# Altium PCB PCB.PcbDoc
Units mil, origin at the board's own origin, x right, y up, seen from the top; angles counter-clockwise.
Board outline 1418.05 x 1418.05 mil, 2 copper layers (Top Layer, Bottom Layer); 70 components, 53 nets, 247 pads, 87 vias.
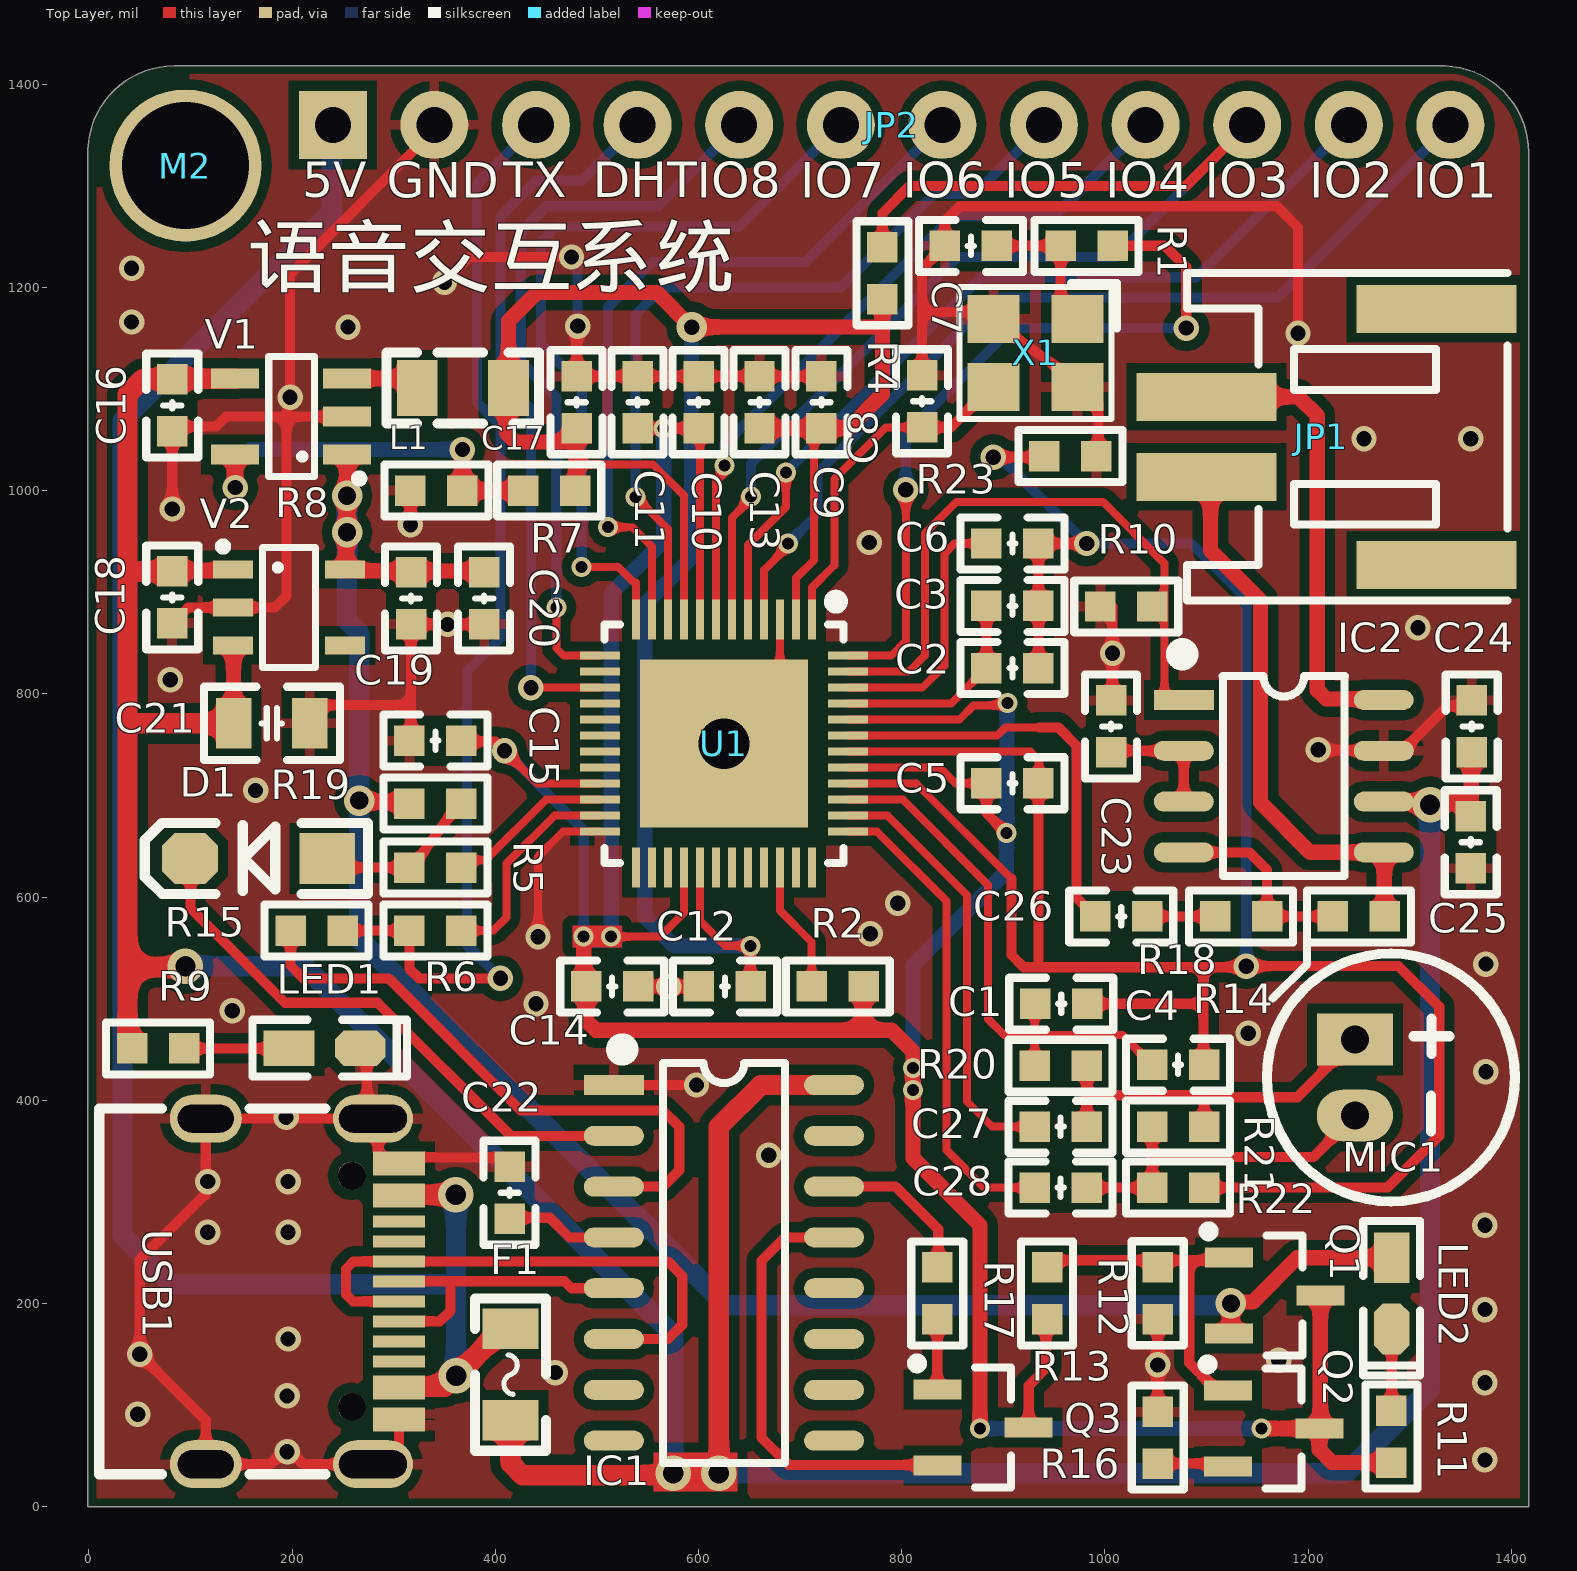
[diagram p0: Top Layer view]
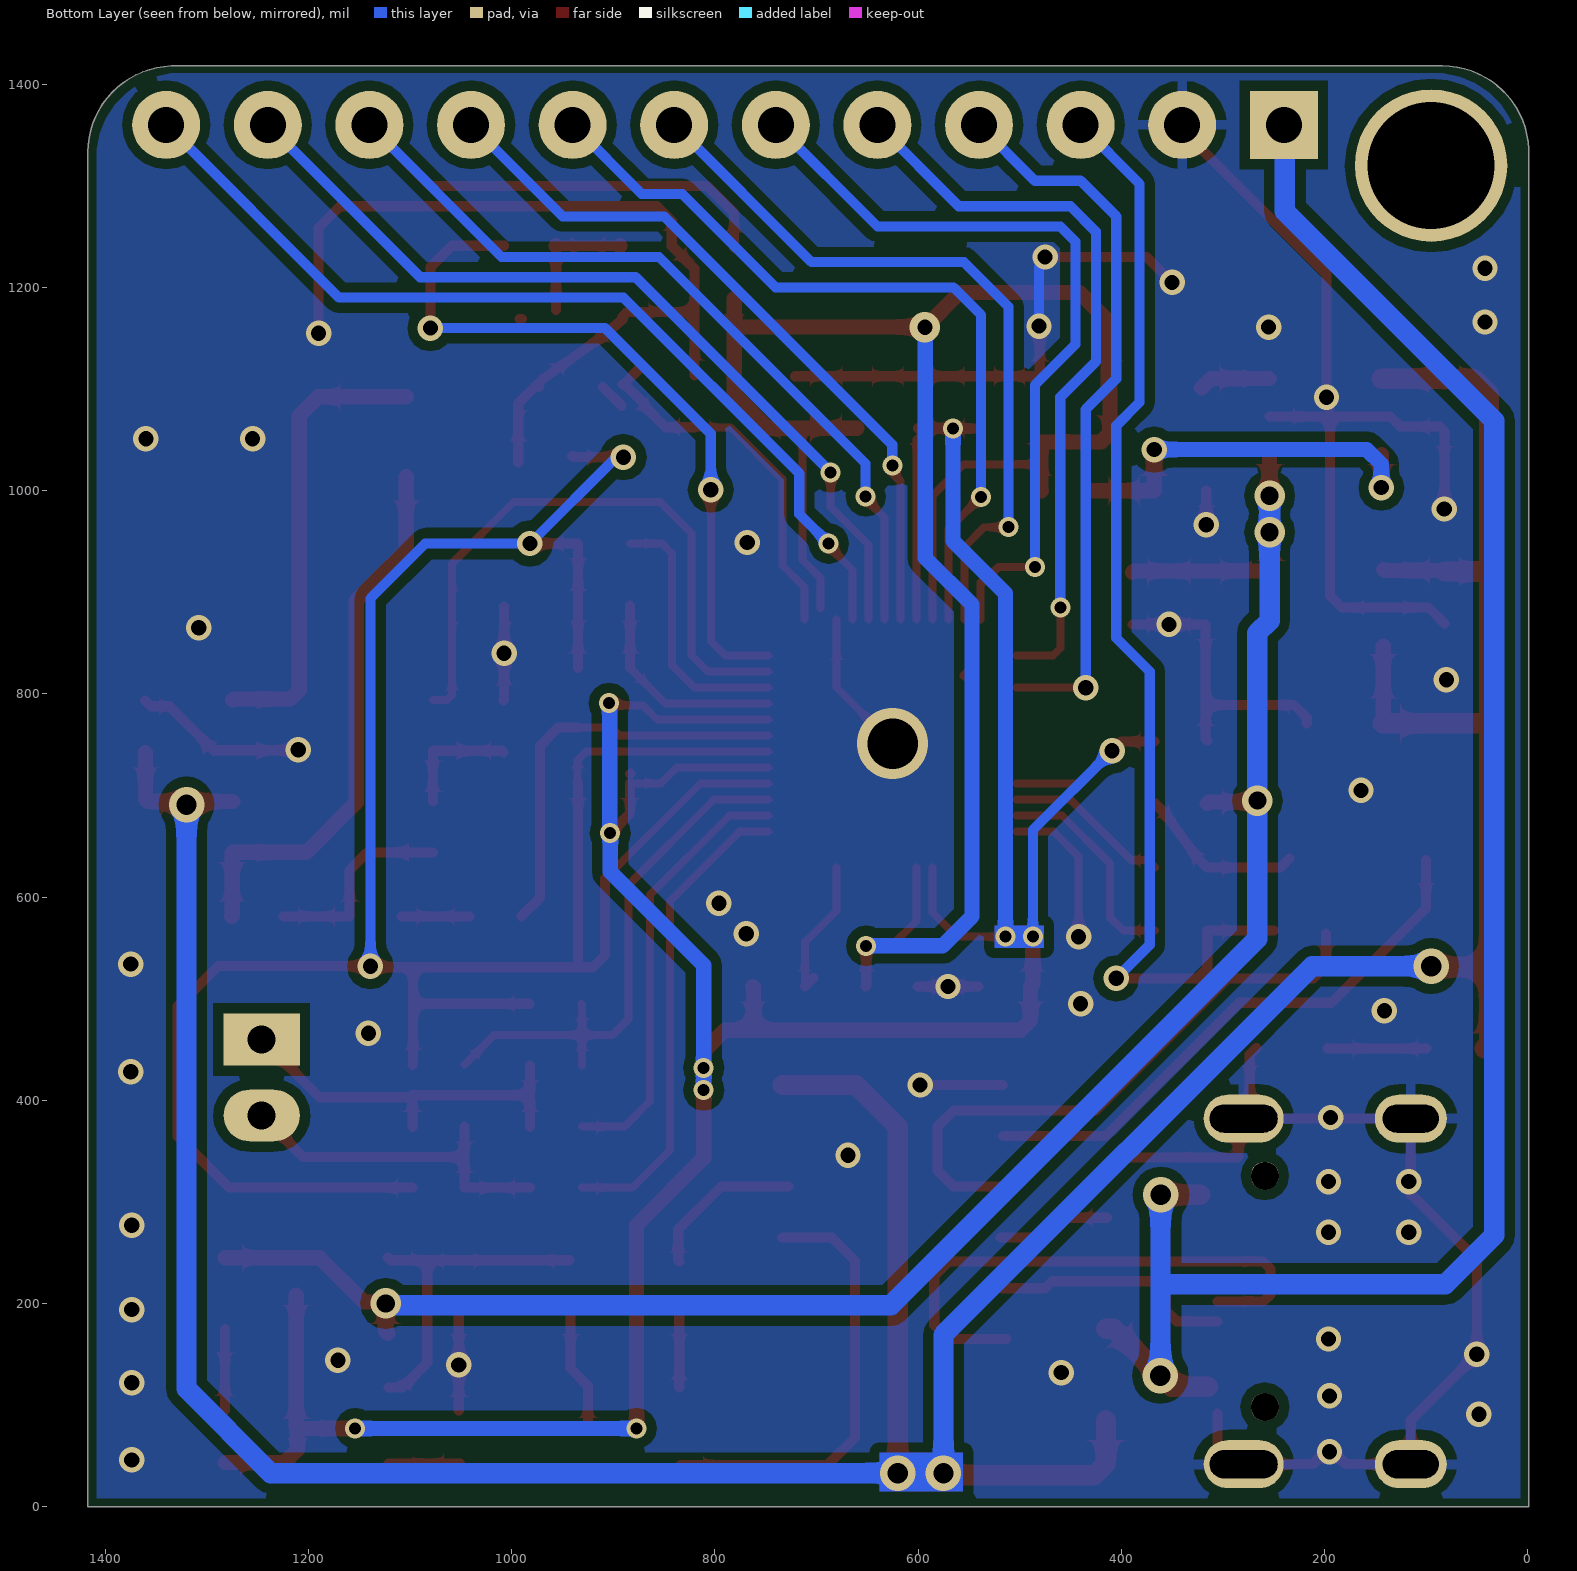
[diagram p1: Bottom Layer view, seen from below]
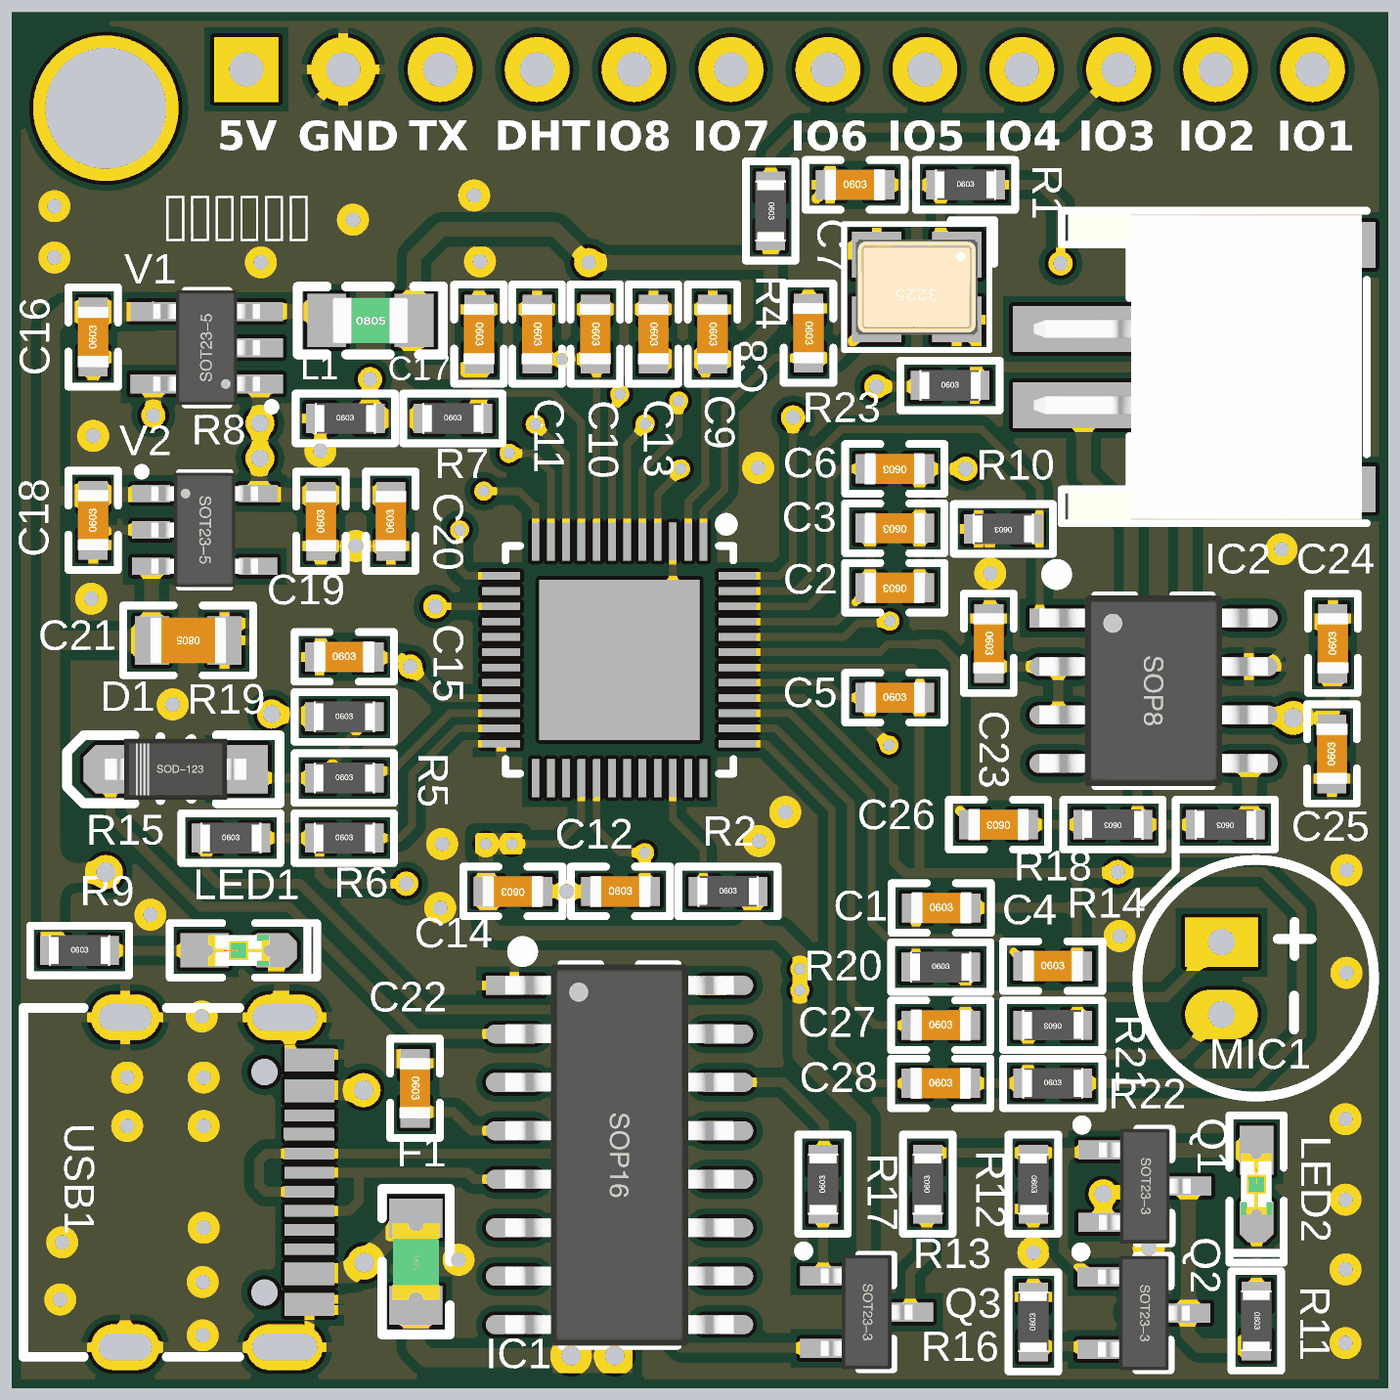
[diagram p2: 3D render of the assembled board from above, using the file's embedded part models]

## Layer stack, top to bottom
Top Solder: solder mask 0.4, Solder Resist, Dk 3.5
Top Layer: signal copper 1.4
Dielectric 1: dielectric 12.6, FR-4, Dk 4.8
Bottom Layer: signal copper 1.4
Bottom Solder: solder mask 0.4, Solder Resist, Dk 3.5

## Board outline
-1,0 -1,1336 cw(c84,1333) 84,1418.05 1335,1418 cw(c1332,1333) 1417.05,1333 1417,0

## Design rules (kind name [scope] priority, off if disabled: settings)
Clearance [All] p1: gap=10 ignorepadtopadclearanceinfootprint=FALSE
PolygonConnect PolygonConnect_13 [IsVia] p1: thpad.connectstyle=Relief thpad.reliefconductorwidth=10 thpad.reliefentries=4 thpad.polygonreliefangle="90 Angle" thpad.airgapwidth=10 smdpad.connectstyle=Relief smdpad.reliefconductorwidth=10 smdpad.reliefentries=4 smdpad.polygonreliefangle="90 Angle" smdpad.airgapwidth=10 via.connectstyle=Direct via.reliefconductorwidth=10 via.reliefentries=4 via.polygonreliefangle="90 Angle" via.airgapwidth=10
PolygonConnect 154145 [All] p2: thpad.connectstyle=Relief thpad.reliefconductorwidth=10 thpad.reliefentries=4 thpad.polygonreliefangle="90 Angle" thpad.airgapwidth=10 smdpad.connectstyle=Relief smdpad.reliefconductorwidth=10 smdpad.reliefentries=4 smdpad.polygonreliefangle="90 Angle" smdpad.airgapwidth=10 via.connectstyle=Direct via.reliefconductorwidth=10 via.reliefentries=4 via.polygonreliefangle="90 Angle" via.airgapwidth=10
PolygonConnect PolygonConnect_12 [IsVia] p3: thpad.connectstyle=Relief thpad.reliefconductorwidth=10 thpad.reliefentries=4 thpad.polygonreliefangle="90 Angle" thpad.airgapwidth=10 smdpad.connectstyle=Relief smdpad.reliefconductorwidth=10 smdpad.reliefentries=4 smdpad.polygonreliefangle="90 Angle" smdpad.airgapwidth=10 via.connectstyle=Direct via.reliefconductorwidth=10 via.reliefentries=4 via.polygonreliefangle="90 Angle" via.airgapwidth=10
PolygonConnect PolygonConnect_11 [IsVia] p4: thpad.connectstyle=Direct thpad.reliefconductorwidth=10 thpad.reliefentries=4 thpad.polygonreliefangle="90 Angle" thpad.airgapwidth=10 smdpad.connectstyle=Relief smdpad.reliefconductorwidth=10 smdpad.reliefentries=4 smdpad.polygonreliefangle="90 Angle" smdpad.airgapwidth=10 via.connectstyle=Relief via.reliefconductorwidth=10 via.reliefentries=4 via.polygonreliefangle="90 Angle" via.airgapwidth=10
PolygonConnect PolygonConnect_10 [IsVia] p5: thpad.connectstyle=Direct thpad.reliefconductorwidth=10 thpad.reliefentries=4 thpad.polygonreliefangle="90 Angle" thpad.airgapwidth=10 smdpad.connectstyle=Relief smdpad.reliefconductorwidth=10 smdpad.reliefentries=4 smdpad.polygonreliefangle="90 Angle" smdpad.airgapwidth=10 via.connectstyle=Relief via.reliefconductorwidth=10 via.reliefentries=4 via.polygonreliefangle="90 Angle" via.airgapwidth=10
PolygonConnect PolygonConnect_9 [IsVia] p6: thpad.connectstyle=Direct thpad.reliefconductorwidth=10 thpad.reliefentries=4 thpad.polygonreliefangle="90 Angle" thpad.airgapwidth=10 smdpad.connectstyle=Relief smdpad.reliefconductorwidth=10 smdpad.reliefentries=4 smdpad.polygonreliefangle="90 Angle" smdpad.airgapwidth=10 via.connectstyle=Relief via.reliefconductorwidth=10 via.reliefentries=4 via.polygonreliefangle="90 Angle" via.airgapwidth=10
PolygonConnect PolygonConnect_8 [IsVia] p7: thpad.connectstyle=Direct thpad.reliefconductorwidth=10 thpad.reliefentries=4 thpad.polygonreliefangle="90 Angle" thpad.airgapwidth=10 smdpad.connectstyle=Relief smdpad.reliefconductorwidth=10 smdpad.reliefentries=4 smdpad.polygonreliefangle="90 Angle" smdpad.airgapwidth=10 via.connectstyle=Relief via.reliefconductorwidth=10 via.reliefentries=4 via.polygonreliefangle="90 Angle" via.airgapwidth=10
PolygonConnect PolygonConnect_7 [IsVia] p8: thpad.connectstyle=Direct thpad.reliefconductorwidth=10 thpad.reliefentries=4 thpad.polygonreliefangle="90 Angle" thpad.airgapwidth=10 smdpad.connectstyle=Relief smdpad.reliefconductorwidth=10 smdpad.reliefentries=4 smdpad.polygonreliefangle="90 Angle" smdpad.airgapwidth=10 via.connectstyle=Relief via.reliefconductorwidth=10 via.reliefentries=4 via.polygonreliefangle="90 Angle" via.airgapwidth=10
PolygonConnect PolygonConnect_6 [IsVia] p9: thpad.connectstyle=Direct thpad.reliefconductorwidth=10 thpad.reliefentries=4 thpad.polygonreliefangle="90 Angle" thpad.airgapwidth=10 smdpad.connectstyle=Relief smdpad.reliefconductorwidth=10 smdpad.reliefentries=4 smdpad.polygonreliefangle="90 Angle" smdpad.airgapwidth=10 via.connectstyle=Relief via.reliefconductorwidth=10 via.reliefentries=4 via.polygonreliefangle="90 Angle" via.airgapwidth=10
PolygonConnect PolygonConnect_5 [IsVia] p10: thpad.connectstyle=Direct thpad.reliefconductorwidth=10 thpad.reliefentries=4 thpad.polygonreliefangle="90 Angle" thpad.airgapwidth=10 smdpad.connectstyle=Relief smdpad.reliefconductorwidth=10 smdpad.reliefentries=4 smdpad.polygonreliefangle="90 Angle" smdpad.airgapwidth=10 via.connectstyle=Relief via.reliefconductorwidth=10 via.reliefentries=4 via.polygonreliefangle="90 Angle" via.airgapwidth=10 // 1
PolygonConnect PolygonConnect_4 [All vs IsNamedPolygon('GND_L02_P005')] p11: connectstyle=Relief reliefconductorwidth=10 reliefentries=4 polygonreliefangle="90 Angle" airgapwidth=10
PolygonConnect N [IsVia] p12: thpad.connectstyle=Direct thpad.reliefconductorwidth=10 thpad.reliefentries=4 thpad.polygonreliefangle="90 Angle" thpad.airgapwidth=10 smdpad.connectstyle=Relief smdpad.reliefconductorwidth=10 smdpad.reliefentries=4 smdpad.polygonreliefangle="90 Angle" smdpad.airgapwidth=10 via.connectstyle=Relief via.reliefconductorwidth=10 via.reliefentries=4 via.polygonreliefangle="90 Angle" via.airgapwidth=10
PolygonConnect PolygonConnect_3 [All vs IsNamedPolygon('NONET_L02_P004')] p13: thpad.connectstyle=Direct thpad.reliefconductorwidth=10 thpad.reliefentries=4 thpad.polygonreliefangle="90 Angle" thpad.airgapwidth=10 smdpad.connectstyle=Relief smdpad.reliefconductorwidth=10 smdpad.reliefentries=4 smdpad.polygonreliefangle="90 Angle" smdpad.airgapwidth=10 via.connectstyle=Relief via.reliefconductorwidth=10 via.reliefentries=4 via.polygonreliefangle="90 Angle" via.airgapwidth=10
PolygonConnect PolygonConnect_2 [All vs IsNamedPolygon('NONET_L02_P003')] p14: thpad.connectstyle=Direct thpad.reliefconductorwidth=10 thpad.reliefentries=4 thpad.polygonreliefangle="90 Angle" thpad.airgapwidth=10 smdpad.connectstyle=Relief smdpad.reliefconductorwidth=10 smdpad.reliefentries=4 smdpad.polygonreliefangle="90 Angle" smdpad.airgapwidth=10 via.connectstyle=Relief via.reliefconductorwidth=10 via.reliefentries=4 via.polygonreliefangle="90 Angle" via.airgapwidth=10
PolygonConnect PolygonConnect_1 [IsVia] p15: thpad.connectstyle=Relief thpad.reliefconductorwidth=10 thpad.reliefentries=4 thpad.polygonreliefangle="90 Angle" thpad.airgapwidth=10 smdpad.connectstyle=Relief smdpad.reliefconductorwidth=10 smdpad.reliefentries=4 smdpad.polygonreliefangle="90 Angle" smdpad.airgapwidth=10 via.connectstyle=Direct via.reliefconductorwidth=10 via.reliefentries=4 via.polygonreliefangle="45 Angle" via.airgapwidth=10
PolygonConnect [All] p16: connectstyle=Relief reliefconductorwidth=10 reliefentries=4 polygonreliefangle="90 Angle" airgapwidth=10
RoutingVias [All] p1: holewidth=28 width=50 viastyle="Through Hole" minholewidth=28 minwidth=50 maxholewidth=28 maxwidth=50
SolderMaskExpansion [All] p1: expansion=4 istentingtop=FALSE
Width [All] p1: maxlimit=50 minlimit=5 preferedwidth=20
30 further rules are at their usual default settings.

## Classes and differential pairs
polygon class PolygonClass_1: NONET_L01_P000
component class OTHER: C16 C17 C18 C19 C20 C21 C22 C23 C24 C25 C26 C27 C28 D1 F1 IC1 IC2 JP2 L1 LED1 LED2 M1 M2 MIC1 Q1 Q2 Q3 R3 R7 R8 R9 R10 R11 R12 R13 R14 R15 R16 R17 R18 R19 R20 R21 R22 R23 USB1 V1 V2
component class MCU: C1 C2 C3 C4 C5 C6 C7 C8 C9 C10 C11 C12 C13 C14 C15 R1 R2 R3 R4 R5 R6 U1 X1

## Components (designator, comment, footprint, x,y, rotation, side; value= is the part's Value field where it differs from the comment)
C1 "104" "C 0603_L" 957,495 r0 top
C2 "104" "C 0603_L" 908.99,825.33 r180 top
C3 "4.7uF" "C 0603_L" 908.99,886.66 r180 top
C4 "4.7uF" "C 0603_L" 1072,435 r0 top
C5 "4.7uF" "C 0603_L" 909,712 r0 top
C6 "4.7uF" "C 0603_L" 908.99,948 r180 top
C7 "22pF" "C 0603_L" 868,1241 r0 top
C8 "22pF" "C 0603_L" 820,1088 r270 top
C9 "104" "C 0603_L" 721,1087 r270 top
C10 "104" "C 0603_L" 600,1087 r270 top
C11 "104" "C 0603_L" 540,1087 r270 top
C12 "104" "C 0603_L" 626,512.01 r0 top
C13 "104" "C 0603_L" 660,1087 r270 top
C14 "104" "C 0603_L" 515,512 r180 top
C15 "104" "C 0603_L" 341,754 r0 top
C16 "4.7uF" "C 0603_L" 82,1084 r90 top
C17 "4.7uF" "C 0603_L" 480,1087 r270 top
C18 "4.7uF" "C 0603_L" 82,895 r90 top
C19 "4.7uF" "C 0603_L" 317,894 r90 top
C20 "104" "C 0603_L" 389,894 r90 top
C21 "10uF" "C 0805_L" 180,771 r180 top
C22 "104" "C 0603_L" 414,309 r270 top
C23 "1uF" "C 0603_L" 1006,768 r270 top
C24 "104" "C 0603_L" 1361,768 r90 top
C25 "10uF" "C 0603_L" 1360,654 r90 top
C26 "104" "C 0603_L" 1016,581 r180 top
C27 "104" "C 0603_L" 956.41,374 r0 top
C28 "104" "C 0603_L" 956.41,314 r0 top
D1 "1N4007" SOD-123 167,638 r180 top
F1 "MSMD200" "FU 0805" 415,130 r270 top
IC1 "CH340C" SOP16_L 625,240 r0 top
IC2 "BL6281" SOP8_L 1176,719 r0 top
JP1 "HDR-1X2" PH2.0-WS-2P 1326,1053 r90 top
JP2 "HDR-1X12" HDR2.54-LI-12P 790,1360 r0 top
L1 "2.2uH" "L 0805" 368,1101 r0 top
LED1 "红色" "LED 0603R" 232,451 r0 top
LED2 "红色" "LED 0603R" 1282,210 r270 top
M1 "" "M3 125X200"#1 1629,1008 r0 top
M2 "" "M3 125X200"#2 95,1320 r0 top
MIC1 "MIC" MIC-6*2.7 1246,459.8 r270 top
Q1 "SI2301" SOT23-3N 1167,208 r270 top
Q2 "SI2302" SOT23-3N 1166,77 r270 top
Q3 "SS8550" SOT23-3N 880,78 r270 top
R1 "470R" "R 0603_L" 982,1241 r0 top
R2 "4K7" "R 0603_L" 737,512 r0 top
R4 "2.2K" "R 0603_L" 781,1214 r270 top
R5 "330R" "R 0603_L" 341,629 r0 top
R6 "330R" "R 0603_L" 341,567 r0 top
R7 "22K" "R 0603_L" 453,1000 r0 top
R8 "22K" "R 0603_L" 342,1000 r0 top
R9 "3K3" "R 0603_L" 68,451 r0 top
R10 "10K" "R 0603_L" 1021,886 r180 top
R11 "4K7" "R 0603_L" 1282,69 r270 top
R12 "47K" "R 0603_L" 1052,210 r270 top
R13 "330R" "R 0603_L" 943,210 r90 top
R14 "22K" "R 0603_L" 1250,581 r180 top
R15 "330R" "R 0603_L" 224,567 r0 top
R16 "100R" "R 0603_L" 1052,68 r90 top
R17 "470R" "R 0603_L" 835,210 r90 top
R18 "4K7" "R 0603_L" 1134,581 r180 top
R19 "4K7" "R 0603_L" 340.99,692 r0 top
R20 "2.2K" "R 0603_L" 956.41,434 r0 top
R21 "10K" "R 0603_L" 1072,374 r180 top
R22 "2.2K" "R 0603_L" 1072,314 r0 top
R23 "0R" "R 0603_L" 966,1034 r0 top
U1 "TW-ASR-ONE" "QFN48 6X6" 625,751 r270 top
USB1 "TYPE-C" TYPE-C_16P 279.57,382 r270 top
V1 "RY3408" SOT23-5N 199,1073 r90 top
V2 "LIN1134A332MR" SOT23-5L 197,885 r270 top
X1 "12.288MHz" "OSC 3225-4P" 931.66,1135.54 r180 top

## Footprints (in the part's own frame and the unit in brackets; to place one, negate y for a bottom-side part, rotate by r counter-clockwise, add the part's x,y. Pads: shape width x height; smd on the part's side, far side on the other; paste and mask are expansions set on the pad)
"C 0603_L" [mil] "无极性贴片电容"
  rect 30x30 smd: 1(-25.59,0) 2(25.59,0)
  silkscreen extent -51,-26 51,26, body extent -31,-16 31,16, height 32
"C 0805_L" [mil] "无极性贴片电容"
  rect 35x50 smd: 1(-37.4,0) 2(37.4,0)
  silkscreen extent -67,-36 67,36, body extent -39,-24 39,24, height 20
"FU 0805" [mil] "贴片保险丝"
  rect 40x55 smd: 1(-45,0) 2(45,0)
  silkscreen extent -75,-35 75,35, body extent -39,-24 39,24, height 20
HDR2.54-LI-12P [mm] "排针，13脚"
  rect 1.7x1.7 hole 0.9: 1(-13.97,0)
  round 1.7 hole 0.9: 2(-11.43,0) 3(-8.89,0) 4(-6.35,0) 5(-3.81,0) 6(-1.27,0) 7(1.27,0) 8(3.81,0) 9(6.35,0) 10(8.89,0) 11(11.43,0) 12(13.97,0)
"L 0805" [mil] "小功率贴片电感"
  rect 40x55 smd: 1(-45,0) 2(45,0)
  silkscreen extent -75,-35 75,35, body extent -39,-24 39,24, height 35
"LED 0603R" [mil] "红色0603LED"
  rect 50x35 smd: 1(-35,0.26)
  oct 50x35 smd: 2(35,0.26)
  silkscreen extent -71,-28 81,28, body extent -31,-16 32,16, height 24
"M3 125X200"#1 [mil] "M3螺丝孔，孔125Mil，焊盘200Mil"
"M3 125X200"#2 [mil] "M3螺丝孔，孔125Mil，焊盘200Mil"
  round 150 hole 125: 1(0,0)
MIC-6*2.7 [mil]
  rect 51x75 hole 27.56: 1(0,0)
  oval 51x75 hole 27.56: 2(74.8,0)
  silkscreen extent -85,-87 159,157
"OSC 3225-4P" [mm] "3.2*2.5*0.7mm(长宽高)"
  rect 1.3x1.2 smd: 1(-1.05,-0.85) 2(1.05,-0.85) 3(1.05,0.85) 4(-1.05,0.85)
  silkscreen extent -2.03,-1.75 1.91,1.65, body extent -1.6,-1.25 1.6,1.25, height 0.7
PH2.0-WS-2P [mm] "长：8mm，宽：7.6mm，高：5.5mm"
  rect 1.2x4 smd: 0(-3.2,-0.006) 0(3.2,-0.006)
  rect 1.2x3.5 smd: 1(-1,5.744) 2(1,5.744)
  silkscreen extent -4.1,-1.78 4.1,6.22, body extent -4,-1.65 4,6.95, height 5.55
"QFN48 6X6" [mm] "48脚，长x宽x高：6x6x1mm，脚距：0.4mm"
  rect 1x0.2 smd: 1(-3.1,2.2) 2(-3.1,1.8) 3(-3.1,1.4) 4(-3.1,1) 5(-3.1,0.6) 6(-3.1,0.2) 7(-3.1,-0.2) 8(-3.1,-0.6) 9(-3.1,-1) 10(-3.1,-1.4) 11(-3.1,-1.8) 12(-3.1,-2.2) 25(3.1,-2.2) 26(3.1,-1.8) 27(3.1,-1.4) 28(3.1,-1) 29(3.1,-0.6) 30(3.1,-0.2) 31(3.1,0.2) 32(3.1,0.6) 33(3.1,1) 34(3.1,1.4) 35(3.1,1.8) 36(3.1,2.2)
  rect 0.2x1 smd: 13(-2.2,-3.1) 14(-1.8,-3.1) 15(-1.4,-3.1) 16(-1,-3.1) 17(-0.6,-3.1) 18(-0.2,-3.1) 19(0.2,-3.1) 20(0.6,-3.1) 21(1,-3.1) 22(1.4,-3.1) 23(1.8,-3.1) 24(2.2,-3.1) 37(2.2,3.1) 38(1.8,3.1) 39(1.4,3.1) 40(1,3.1) 41(0.6,3.1) 42(0.2,3.1) 43(-0.2,3.1) 44(-0.6,3.1) 45(-1,3.1) 46(-1.4,3.1) 47(-1.8,3.1) 48(-2.2,3.1)
  rect 4.2x4.2 smd: 49(0,0)
  silkscreen extent -3.7,-2.98 2.98,2.98
"R 0603_L" [mil] "1/10W贴片电阻"
  rect 30x30 smd: 1(-25.59,0) 2(25.59,0)
  silkscreen extent -51,-26 51,26, body extent -31,-16 32,16, height 16
SOD-123 [mil] "2.7x1.6X1.1mm（长宽高，不包括引脚）"
  rect 55x50 smd: 1(-67.5,0)
  oct 55x50 smd: 2(67.5,0)
  silkscreen extent -108,-35 112,35, body extent -73,-31 73,31, height 48
SOP8_L [mm] "5*6*1.8mm（长宽高）"
  rect 1.5x0.5 smd: 1(-2.5,1.905)
  oval 1.5x0.5 smd: 2(-2.5,0.635) 3(-2.5,-0.635) 4(-2.5,-1.905) 5(2.5,-1.905) 6(2.5,-0.635) 7(2.5,0.635) 8(2.5,1.905)
  silkscreen extent -2.69,-2.5 1.52,3.2, body extent -3,-2.5 3,2.5, height 1.9
SOP16_L [mm] "10.3*6.2*1.8mm（长宽高）"
  rect 1.5x0.5 smd: 1(-2.752,4.445)
  oval 1.5x0.5 smd: 2(-2.752,3.175) 3(-2.752,1.905) 4(-2.752,0.635) 5(-2.752,-0.635) 6(-2.752,-1.905) 7(-2.752,-3.175) 8(-2.752,-4.445) 9(2.752,-4.445) 10(2.752,-3.175) 11(2.752,-1.905) 12(2.752,-0.635) 13(2.752,0.635) 14(2.752,1.905) 15(2.752,3.175) 16(2.752,4.445)
  silkscreen extent -2.69,-5 1.52,5.49, body extent -3,-5 3,5, height 1.9
SOT23-3N [mm] "3x1.3x1mm(长宽高)"
  rect 0.5x1.2 smd: 1(-0.95,-1.143) 2(0.95,-1.143) 3(0,1.143)
  silkscreen extent -1.72,-1.78 1.5,0.7, body extent -1.5,-1.2 1.5,1.2, height 1.05
SOT23-5L [mm] "3x1.6x1.1mm(长宽高)"
  rect 0.45x1 smd: 1(-0.95,-1.4) 2(0,-1.4) 3(0.95,-1.4) 4(0.95,1.4) 5(-0.95,1.4)
  silkscreen extent -1.6,-1.73 1.5,0.66, body extent -1.5,-1.4 1.5,1.4, height 1.15
SOT23-5N [mm] "3x1.6x1.1mm(长宽高)"
  rect 0.5x1.2 smd: 1(-0.95,-1.4) 2(0,-1.4) 3(0.95,-1.4) 4(0.95,1.4) 5(-0.95,1.4)
  silkscreen extent -1.63,-1.78 1.5,0.56, body extent -1.5,-1.4 1.5,1.4, height 1.15
TYPE-C_16P [mm] "16脚TYPE-C母座"
  oval 1.2x2 hole 0.7 slot 1.7 at 90 deg: 1(0,0) 2(8.64,0)
  oval 1.2x1.8 hole 0.7 slot 1.4 at 90 deg: 3(0,-4.18) 4(8.64,-4.18)
  rect 0.3x1.3 smd: A1(0.97,0.65) A4(1.77,0.65) A5(3.07,0.65) A6(4.07,0.65) A7(4.57,0.65) A8(5.57,0.65) A9(6.87,0.65) A12(7.67,0.65) B1(7.37,0.65) B4(6.57,0.65) B5(6.07,0.65) B6(5.07,0.65) B7(3.57,0.65) B8(2.57,0.65) B9(2.07,0.65) B12(1.27,0.65)
  round 0.7 hole 0.7 unplated: ""(1.43,-0.53) ""(7.21,-0.53)
  silkscreen extent -0.25,-6.84 8.89,-1.19

## Part data
C1 C2 C3 C4 C5 C6 C7 C8 C9 C10 C11 C12 C13 C14 C15 C16 C17 C18 C19 C20 C21 C22 C23 C24 C25 C26 C27 C28: library part C, "无极性贴片电容", BOM名称=无极性贴片电容, 学习资源=www.ooocke.com, 版权归属=源创客
D1: "整流二极管", BOM名称=整流二极管, 学习资源=www.ooocke.com, 版权归属=源创客
F1: library part FU, "贴片保险丝", BOM名称=贴片保险丝, 学习资源=www.ooocke.com, 版权归属=源创客
IC1: library part CH340G, "串口转USB", BOM名称=串口转USB, 学习资源=www.ooocke.com, 版权归属=源创客
IC2: "音频功放"
JP1: library part "Header 2", "2P接插件", BOM名称=2P接插件, 学习资源=www.ooocke.com, 版权归属=源创客
JP2: library part "Header 12", "12P接插件", BOM名称=12P接插件, 学习资源=www.ooocke.com, 版权归属=源创客
L1: library part L, "小功率贴片电感", BOM名称=小功率贴片电感, 学习资源=www.ooocke.com, 版权归属=源创客
LED1 LED2: library part LED-SMD, "贴片LED", BOM名称=贴片LED, 学习资源=www.ooocke.com, 版权归属=源创客
M1 M2: library part M3, "铜柱孔", BOM名称=铜柱孔, 学习资源=www.ooocke.com, 版权归属=源创客
MIC1: library part MIC3, "麦克风"
Q1: "P沟道 20V/2.8A", BOM名称=场效应管, 学习资源=www.ooocke.com, 描述="P沟道 20V/2.8A", 版权归属=源创客
Q2: "N沟道 20V/3A", BOM名称=场效应管, 学习资源=www.ooocke.com, 描述="N沟道 20V/3A", 版权归属=源创客
Q3: library part 8550-SMD, "高频放大-PNP型", BOM名称=高频放大-PNP型, 学习资源=www.ooocke.com, 属性="40V 1.5A 1W 100MHZ", 版权归属=源创客
R1 R2 R4 R5 R6 R7 R8 R9 R10 R11 R12 R13 R14 R15 R16 R17 R18 R19 R20 R21 R22 R23: library part R, "贴片电阻", BOM名称=贴片电阻, 学习资源=www.ooocke.com, 版权归属=源创客
USB1: library part TYPE-C_16P, "16脚TYPE-C母座"
V1: "DC电源芯片"
V2: "DC稳压芯片"
X1: library part XTAL-4P, "4脚无源晶振", BOM名称=4脚无源晶振, 学习资源=www.ooocke.com, 版权归属=源创客

## Via types
v1: diameter 25, hole 15, Top Layer to Bottom Layer, 57 vias
v2: diameter 19.68, hole 11.81, Top Layer to Bottom Layer, 18 vias
v3: diameter 35, hole 20, Top Layer to Bottom Layer, 6 vias
v4: diameter 30, hole 18, Top Layer to Bottom Layer, 4 vias
v5: diameter 30, hole 15, Top Layer to Bottom Layer, 1 vias
v6: diameter 70, hole 50, Top Layer to Bottom Layer, 1 vias

## Nets (pads, with @x,y where several pads share a name; then routed paths per layer and width w, separated by ;. In a path a pad name is that pad's centre, name@x,y a point inside that pad or via, vN(x,y) a via of type N, cw(c..) or ccw(c..) an arc to the next point about the centre after c; other vN are vias at no path point)
1V2: C9.2 C12.2 C13.2 C17.2 L1.2 R4.2 R7.2 U1.2 U1.9 U1.29 | length 2150.6
  Top Layer w7.87: 479.29,1026 555,1026 585.63,995.37 U1.9 ; U1.29 601.38,576.62 626,552 v2(651,552) ; U1.2@696,884 696,914 713.58,931.58 C9.2@713.58,1054
  Top Layer w10: v2(651,552) 651,512.59 C12.2 ; C9.2@713.58,1054 C9.2
  Top Layer w15: L1.2@411,1101 411,1056.79 419.79,1048 479.29,1048 479.29,1026 479.29,1000.7 R7.2 ; L1.2 413,1167 441,1195 559,1195 v5(593.21,1160.79) ; v5@593,1161 779,1161 781,1163 ; C13.2 C9.2 747.41,1061.41 781,1095 781,1163 ; R4.2@781,1189 781,1163
  Bottom Layer w15: v5(593.21,1160.79) 593,1160.57 593,934 547,888 547,581 576,552 v2(651,552)
3V3: C19.2 C20.2 LED2.1 Q1.2 R19.1 V1.1 V2.5 | length 1958.7
  Top Layer w10: V2.5@253.48,921.04 V2.5@254.12,921.69
  Top Layer w15: V2.5@253.48,921.04 387.55,921.04 C20.2 ; v4@254,994.88 254,956 253.06,955.06 253.06,922.74 V2.5@254.12,921.69 ; v4@254.12,995 V1.1 ; v4(266,695) 267.5,693.5 313.9,693.5 R19.1 ; Q1.2 1124,172.6 v4(1124,200) 1125.52,201.52 1145.52,201.52 1189,245 LED2.1
  Bottom Layer w20: v4(254,995) 254,872 266,860 v4(266,695) 266,559 626.88,198.12 1122.12,198.12 v4(1124,200)
  other v4: 254,959
5V: C16.2 C18.2 C21.2 C24.1 C25.2 F1.2 IC1.16 IC2.6 R9.1 V1.4 V2.1 V2.3 | length 4032.1
  Top Layer w15: C18.2@81.86,920.45 C18.2 82.91,921.49 140.97,921.49 V2.1 ; C21.2@142.24,771.36 V2.3@142.24,847.24 ; IC2.6 1358.5,694 1360.5,696 1360.5,741.91 C24.1
  Top Layer w20: 39,771 C21.2 C21.2@142.24,771.36 ; 39,920.45 C18.2@81.86,920.45 ; R9.1 38,455.4 38,531 ; v3(95,532) 94,531 38,531 ; V1.4 143.72,1110.24 82.66,1110.24 C16.2 81.59,1110 53,1110 38,1095 38,920.45 38,771 38,531 ; F1.2 415,42.72 426.72,31 573,31 v3(575,33) ; v3(620,33) 620,374 661,415 IC1.16
  Bottom Layer w20: v3@96,532 212,532 575,169 v3(575,33) v3(620,33) 1237,33 1320,116 v3(1320,691)
AGND: C1.2 C2.1 C3.1 C4.2 C5.2 C6.1 R22.2 R23.1 U1.40 U1.42 | length 2592.2
  Top Layer w7.87: U1.40 814.37,711.63 908,618 ; U1.42 926.88,743.12 935,735 C5.2@935,712.41
  Top Layer w10: v1(890,1033) 939.41,1033 R23.1 ; 908,618 908,543 920,531 935,531 ; C2.1 C3.1 C6.1 v1(982,948) ; C5.2@935,712.41 C5.2 934.59,531.41 935,531 ; C1.2 1097,495 ; R22.2 1278,314 1329,365 1329,492 1289,532 v1(1139,532) 1138,531 1097,531 ; C4.2 1097,435.58 1097,495 ; 935,531 1097,531 ; 1097,495 1097,531
  Bottom Layer w10: v1(890,1033) v1@894.06,1033 ; v1@895.53,1034.47 v1(982,948) 1085,948 1139,894 v1(1139,532)
AVDDRV: C5.1 C10.2 C11.2 C14.2 C15.2 Q1.3 Q2.3 R2.2 R11.2 U1.8 U1.21 U1.28 U1.41 U1.44 | length 3496.5
  Top Layer w7.87: C15.2 C15.2@367.58,753 ; v1(409,744) 441.37,711.63 U1.21 ; v2(514,561) 562,561 585.63,584.63 U1.28 ; C10.2@594,1055.42 596.31,1055.42 601.38,1050.35 U1.8 ; U1.41 837.62,727.38 853,712 C5.1 ; U1.44 856.62,774.62 870.61,788.61 901.76,788.61 v2(904,790.84)
  Top Layer w10: C15.2@367.58,753 400,753 v1(409,744) ; C14.2@487,514.42 C14.2 ; v2(487,561) v2(514,561) ; C11.2 540.14,1061.27 v2(565.66,1061.27) v2@567.71,1061.27 ; v2@570,1061.41 C10.2@595.47,1061.41 ; C10.2@595.47,1056.89 C10.2 ; C5.1@882.93,721.47 C5.1@883.41,721 ; C5.1 883.41,682.59 v2(903,663)
  Top Layer w15: C14.2@487,514.42 v2(487,561) ; C14.2 489.41,478.59 499,469 762,469 ; R2.2 762,511.41 762,469 ; v2(877,77) 877,277 811,343 v2(811,410) v2(811,432) 811,448 790,469 762,469 ; v2(1154,77) Q2.3 ; Q1.3 1212,78 Q2.3 ; R11.2 1223.59,43.41 1211,56 Q2.3
  Bottom Layer w10: v1(409,744) 487,666 v2(487,561) ; v2(903,663) v2@904.5,664.5
  Bottom Layer w15: v2(514,561) 514,899 565.66,950.66 v2(565.66,1061.27) ; v2(811,410) v2(811,432) 811,533 903,625 v2(903,663) ; v2(877,77) v2(1154,77) ; v2(904,790.84) 903.5,790.34 903.5,665.16 904.16,664.5 v2@904.5,664.5
D+: IC1.5 USB1.A6 USB1.B6 | length 298.5
  Top Layer w10: USB1.B6 345.39,182.39 356,193 356,221.88 ; USB1.A6 305.28,221.88 356,221.88 ; IC1.5 475,215 468.12,221.88 356,221.88
D-: IC1.6 USB1.A7 USB1.B7 | length 544.8
  Top Layer w10: USB1.A7 259.92,202.08 253,209 253,234 260.45,241.45 USB1.B7 569.55,241.45 584,227 584,179 570,165 IC1.6@513.07,165
DTR: IC1.13 Q3.2 | length 437.9
  Top Layer w10: IC1.13@733.69,265 685,265 662,242 662,68 688.86,41.14 Q3.2@833.54,41.14
GND: C7.1 C8.1 C9.1 C10.1 C11.1 C12.1 C13.1 C14.1 C15.1 C16.1 C17.1 C18.1 C19.1 C20.1 C21.1 C22.1 C23.1 C24.2 C25.1 IC1.1 IC2.7 JP2.2 LED1.2 R8.1 R10.2 R12.2 R16.2 R23.2 U1.3 U1.24 U1.49 USB1.1 USB1.2 USB1.3 USB1.4 USB1.A1 USB1.A12 USB1.B1 USB1.B12 V1.2 V2.2 X1.2 X1.4 | length 4473.9
  Top Layer w7.87: v1(442,561) 442,640 466.39,664.39 U1.24 ; v6(625,751) 680.12,806.12 U1.3
  Top Layer w10: C18.1 97.6,885 V2.2 183,885 194.56,896.56 194.56,1073 ; v1(82,982) C16.1 86.6,1063 125,1063 135,1073 194.56,1073 ; C21.1 217.4,776.5 229.9,789 317,789 ; V1.2 194.56,1073 ; LED1.2 273.54,444.73 273.54,388.03 USB1.1 ; USB1.B1 USB1.A12 305.16,61.77 285.24,41.84 USB1.2 211.22,41.84 199.06,54 v1(195,54) 190.94,54 178.78,41.84 USB1.4 115,85 v1(50,150) 50,243 114,307 115,307 115,320 USB1.3 194,382 USB1.1 ; C15.1 317,755.59 317,789 ; v1@316,966 v1(316.41,966.41) R8.1 ; JP2.2 340,1355 198,1213 v1(198,1092) 195.13,1089.13 195.13,1075.07 194.56,1074.5 194.56,1073 ; v1(350,1205) 375,1230 v1(475,1230) ; C20.1 v1(353,868.41) C19.1 317,789 ; C22.1@410.4,331 C22.1 ; C22.1@414,335.59 405.78,343.81 USB1.A1 285.48,343.81 284.58,344.72 284.58,376.99 USB1.1 ; v1(481,1162) 480.16,1161.16 480.16,1112.76 C17.1 C11.1 570,1112.59 C10.1 C13.1 C9.1 ; IC1.1 v1(598,415) ; C14.1 v1(570.5,512) C12.1 ; U1.49@552.1,819.9 U1.49@554,818 ; C8.1 820,1176 ; X1.2 910.61,1151.9 910.91,1151.65 969.33,1109.86 972.18,1107.01 972.71,1103.84 X1.4 ; X1.2@890.66,1171.46 886.13,1176 820,1176 ; X1.4@973.34,1104.54 974.97,1104.54 993.59,1085.91 R23.2@993.59,1028 ; R10.2@1007.41,886 v1(1007.41,840.09) 1007.41,794.18 C23.1@1008,793.59 ; R16.2@1052,94.59 v1(1052,139.5) R12.2 R12.2@1052,191.41 ; v1(1190,1155) 1190,1259 1169,1280 857,1280 842.41,1265.41 C7.1 820,1218.59 820,1176 ; v1(1210,745) 1210.5,744.5 1292.5,744.5 1293,744 1336.86,787.86 1355.28,787.86 C24.2
  Bottom Layer w10: v1(475,1230) 475,1225.94 481,1219.94 v1(481,1162)
  other v1: 1374,46 48,91 195,109 1374,122 459,132 1171,144 196,165 1374,194 117,270 196,270 1374,277 117,320 196,320 669,346 194,383 1375,428 1141,466 141,488 440,495 1375,534 769,564 796,594 164,705 80,814 1308,865 768,949 1255,1051 1360,1051 255,1161 42,1166 42,1219
GPIO0_0: JP2.12 U1.4 | length 930.8
  Top Layer w7.87: U1.4 664.37,921.75 v2@688,945.38
  Top Layer w10: v2@688,945.38 v2(688,948)
  Bottom Layer w10: v2(688,948) 717,977 717,1017 890,1190 1170,1190 JP2.12
GPIO0_1: JP2.11 U1.5 | length 856.1
  Top Layer w7.87: U1.5 648.62,946.62 686,984 v2(686,1018)
  Bottom Layer w10: v2(686,1018) 878,1210 1090,1210 JP2.11
GPIO0_2: JP2.10 R4.1 U1.6 | length 1216.3
  Top Layer w7.87: U1.6 632.88,973.25 651.5,991.88 v2(651.5,994.5)
  Top Layer w10: R4.1 781,1273 808,1300 1080,1300 JP2.10
  Bottom Layer w10: v2(651.5,994.5) 651.75,994.75 651.75,1026.75 855,1230 1010,1230 JP2.10
GPIO0_3: JP2.9 U1.7 | length 720.7
  Top Layer w7.87: U1.7 617.12,1009.35 623.49,1015.71 623.49,1023.15 v2(625.34,1025)
  Bottom Layer w10: v2(625.34,1025) 625.34,1045.34 850,1270 950,1270 JP2.9
GPIO0_4: JP2.8 U1.10 | length 792.6
  Top Layer w7.87: v2(538,994) 569.88,962.12 U1.10
  Bottom Layer w10: v2(538,994) 538,1173 565,1200 740,1200 832,1292 872,1292 JP2.8
GPIO0_5: JP2.7 U1.11 | length 743
  Top Layer w7.87: v2(511,964) 535,964 554.13,944.87 U1.11
  Bottom Layer w10: v2(511,964) 511,1181 555,1225 705,1225 JP2.7
GPIO0_6: JP2.6 U1.12 | length 773.4
  Top Layer w7.87: v2(485,925) 520.87,925 536.26,909.61 ; U1.12 538.39,909.61
  Bottom Layer w10: v2(485,925) 485,1104 445,1144 445,1245 460,1260 640,1260 JP2.6
GPIO0_7: JP2.5 U1.13 | length 729
  Top Layer w7.87: v2(460,885) 460,845 467.38,837.62 U1.13
  Bottom Layer w10: v2(460,885) 460,1092 425,1127 425,1255 450,1280 560,1280 JP2.5
GPIO1_1: JP2.4 U1.15 | length 716.7
  Top Layer w7.8: v1(435,806) 435.08,806.08 502.92,806.08 U1.15
  Bottom Layer w10: v1(435,806) 435,1080 405,1110 405,1270 440,1305 485,1305 JP2.4
GPIO3_2: IC2.1 R10.1 U1.47 | length 626.7
  Top Layer w7.87: U1.47 806.87,821.87 823,838 823,958 854,989 998,989 1058.59,928.41 1058.59,798.84 1063.44,794 IC2.1
HPOUT_L: C26.2 U1.43 | length 411.4
  Top Layer w7.87: U1.43 893.88,758.88 902,767 935,767
  Top Layer w10: 935,767 954,767 972,749 972,599.42 C26.2
MICBIAS: C1.1 C4.1 R20.1 U1.39 | length 546
  Top Layer w7.87: U1.39 801.12,695.88 885,612 885,480 900.8,464.2 930.82,464.2 ; R20.1 930.82,464.2 ; C1.1 930.82,494.41 930.82,464.2 ; C4.1 1017.2,464.2 930.82,464.2
MICN_L: C28.1 U1.37 | length 472.4
  Top Layer w7.87: U1.37 775.61,664.39 844,596 844,351 881,314 C28.1
MICP_L: C27.1 U1.38 | length 429.5
  Top Layer w7.87: U1.38 785.87,680.13 864,602 864,399 889,374 C27.1
NetC7_2: C7.2 R1.1 X1.1 | length 127.8
  Top Layer w10: C7.2 R1.1 X1.1@956.41,1178 ; X1.1@990.03,1169 X1.1@992,1169
NetC8_2: C8.2 U1.1 X1.3 | length 394
  Top Layer w7.87: U1.1 711.61,904.61 733.58,926.58 733.58,1011.58 784.41,1062.41 C8.2
  Top Layer w10: C8.2 848.54,1062.41 870.07,1083.95 870.07,1085.91 888.69,1104.54 X1.3@889.86,1104.54 ; X1.3@873.86,1120.54 X1.3@889.86,1104.54 ; X1.3@890.32,1104.07 X1.3@889.86,1104.54 ; X1.3@890.66,1104.54 X1.3@889.86,1104.54 ; X1.3@891.73,1083.45 X1.3@910.35,1102.07
NetC22_2: C22.2 IC1.4 | length 112.7
  Top Layer w10: C22.2@414,284.41 453.59,284.41 473,265 IC1.4@518.63,265
NetC23_2: C23.2 IC2.2 IC2.3 | length 120.2
  Top Layer w10: C23.2@1008,742.41 1009.58,744 IC2.2 IC2.3
NetC26_1: C26.1 R18.2 | length 66.8
  Top Layer w10: C26.1 R18.2
NetC27_2: C27.2 MIC1.1 R20.2 R21.1 | length 377.1
  Top Layer w10: C27.2 982,405 ; R20.2 982,405 ; R21.1 1097.59,403.59 ; 1097.59,403 1189.2,403 MIC1.1 ; 1097.59,405 982,405
NetC28_2: C28.2 MIC1.2 R21.2 R22.1 | length 341
  Top Layer w10: C28.2 R22.1 1046.41,344 ; R21.2 1046.41,344 ; MIC1.2 1205,344 1046.41,344
NetIC2_4: IC2.4 R14.2 R18.1 | length 199.5
  Top Layer w10: IC2.4 1142,644 1159.59,626.41 R18.1 R14.2
NetL1_1: L1.1 V1.3 | length 70.8
  Top Layer w15: V1.3 311.6,1110.4 L1.1@321,1101
NetLED1_1: LED1.1 R9.2 | length 97.5
  Top Layer w10: R9.2@99.59,451 196.74,451 LED1.1
NetLED2_2: LED2.2 R11.1 | length 80.5
  Top Layer w10: R11.1 1282.26,94.86 LED2.2
NetQ1_1: Q1.1 Q2.1 R12.1 R13.2 | length 329.2
  Top Layer w10: R13.2@943,242.59 1051.99,242.59 1083,242.59 ; Q2.1@1121,117.4 1107.22,117.4 1102.38,122.24 1083,141.62 1083,242.59 ; Q1.1 1119.19,242.59 1083,242.59
NetQ2_2: Q2.2 R16.1 | length 70.3
  Top Layer w10: R16.1@1051,42.41 R16.1@1051.81,41.6 ; R16.1@1051.81,42.6 Q2.2@1121,42.6
NetQ3_1: Q3.1 R17.1 | length 73
  Top Layer w10: Q3.1@835,117.4 R17.1@835,190.4
NetQ3_3: Q3.3 R13.1 | length 117.4
  Top Layer w10: Q3.3@925,80 925,119 942,136 R13.1@942,190.4
NetR1_2: R1.2 U1.48 | length 727.1
  Top Layer w7.87: U1.48 789.61,837.61 804,852 v1(804,1001)
  Top Layer w10: R1.2 1059,1241 1080,1220 v1(1080,1160)
  Bottom Layer w10: v1(804,1001) 804,1056 908,1160 v1(1080,1160)
NetR2_1: R2.1 U1.34 | length 142
  Top Layer w7.87: U1.34 680.12,586.88 711.41,555.59 R2.1
  Top Layer w10: R2.1@702.9,520.51 R2.1
NetR5_2: R5.2 U1.22 | length 164.1
  Top Layer w7.87: R5.2 373.99,636.4 390.4,636.4 449.89,695.89 U1.22
NetR6_2: R6.2 U1.23 | length 214.3
  Top Layer w7.87: R6.2 398,567 411,580 411,633 458.14,680.14 U1.23
NetR7_1: R7.1 R8.2 V1.5 | length 385.4
  Top Layer w15: V1.5 143.88,1003.12 v1(144,1003) ; v1(367.59,1040.41) R8.2 R7.1
  Bottom Layer w15: v1(144,1003) 144,1026 158.41,1040.41 v1(367.59,1040.41)
RTS: IC1.14 R17.2 | length 157.6
  Top Layer w10: IC1.14@727.6,315 794,315 836,273 836,242.58 R17.2@835,241.59
RXD: IC1.3 R15.1 | length 593.7
  Top Layer w10: R15.1@198.41,564 198.41,532.59 211,520 295,520 425,390 565,390 581,374 581,331 565,315 IC1.3
SPKL+: IC2.8 JP1.2 | length 452.5
  Top Layer w15: JP1.2@1103.84,1092.37 1190.63,1092.37 1209,1074 1209,803.68 1217.79,794.9 1273.53,794.9 IC2.8
SPKL-: IC2.5 JP1.1 R14.1 | length 546.2
  Top Layer w15: JP1.1@1103.84,1013.63 1103.84,941.16 1153,892 1153,693 1202,644 IC2.5 1275.01,643.42 1275.01,581.59 R14.1
TXD: D1.2 IC1.2 | length 556.7
  Top Layer w10: D1.2@100,636.64 100,589 193,496 284,496 415,365 IC1.2@516.29,365
UART0_RX: D1.1 R5.1 R19.2 | length 166
  Top Layer w10: D1.1 243.5,629 R5.1 325.41,639 356.58,682 R19.2
UART0_TX: JP2.3 R6.1 R15.2 | length 1097.7
  Top Layer w10: R15.2 R6.1 315.41,529.59 325,520 v1(405,520)
  Bottom Layer w10: v1(405,520) 372,553 372,822 405,855 405,1064 382,1087 382,1302 JP2.3
VBUS: F1.1 JP2.1 USB1.A4 USB1.A9 USB1.B4 USB1.B9 | length 1868.3
  Top Layer w20: USB1.B4@315,118 350.5,118 407.5,175 F1.1 ; USB1.A4@322,307 v3(361,307)
  Bottom Layer w20: JP2.1 239,1359 239,1275 33,1069 33,267 81,219 360.24,219 361.29,217.95 ; v3(361,307) 361.29,306.71 361.29,217.95 ; v3(361.57,128.91) 361.29,129.2 361.29,217.95
VCMADC: C2.2 C3.2 U1.45 | length 212.2
  Top Layer w7.87: U1.45 848.44,790.37 C2.2
  Top Layer w10: C2.2 C3.2
VCMDAC: C6.2 U1.46 | length 259.6
  Top Layer w7.87: U1.46 820.12,806.12 842,828 842,938 852,948 C6.2
pads on no net: IC1.7 IC1.8 IC1.9 IC1.10 IC1.11 IC1.12 IC1.15 JP1.0 M2.1 U1.14 U1.16 U1.17 U1.18 U1.19 U1.20 U1.25 U1.26 U1.27 U1.30 U1.31 U1.32 U1.33 U1.35 U1.36 USB1. USB1.A5 USB1.A8 USB1.B5 USB1.B8 V2.4

## Polygon pours and split planes (outlines as drawn)
GND on Top Layer "GND_L01_P000" (solid, remove dead copper, pour order 0): 7.5,8.5 7.5,1326.3 cw(c87.65,1332.14) 67.76,1410 1346.07,1410 cw(c1328.05,1331.58) 1408.5,1333 1408.5,8.5
GND on Bottom Layer "GND_L02_P001" (solid, remove dead copper, pour order 1): 7.5,8.5 7.5,1327.5 cw(c92.53,1326) 91.03,1411.03 1328.03,1411.03 cw(c1325,1327.58) 1408.5,1327.5 1408.5,8.5

## Other copper
Top Layer:
  rectangle net 5V: 555.81,15 638.25,53.12
  rectangle net AVDDRV: 475.87,550.14 524.87,572.14
Bottom Layer:
  rectangle net 5V: 555.56,15 638,53.18
  rectangle net AVDDRV: 476,550 525,572

## Silkscreen, mask and mechanical layers (free items; w line width, h text height)
Top Overlay:
  lines w8: 1165,500 1198.82,533.82 1198.82,536.82 1198.82,555.41
  lines w10: 1304,463 1339,463 ; 1321,369.5 1321,404.5 ; 1321.5,445.5 1321.5,480.5
  text "5V" at 210,1277 h60
  text "GND" at 293,1276.5 h60
  text "TX" at 408,1277 h60
  text "DHT" at 496,1277 h60
  text "IO8" at 598.06,1276.56 h60
  text "IO7" at 700.06,1276.56 h60
  text "IO6" at 801.06,1276.56 h60
  text "IO5" at 901.06,1276.56 h60
  text "IO4" at 1000.06,1276.56 h60
  text "IO3" at 1098.06,1276.56 h60
  text "IO2" at 1201.06,1276.56 h60
  text "IO1" at 1303.06,1276.33 h60
  text "语音交互系统" at 155.09,1182.91 h100
Mechanical 1:
  the board outline again, w10
Mechanical 13:
  lines w10: 1417,1333 1417.05,1333